# Altium PCB Charger-v1.1.PcbDoc (part 1 of 3)
Units mil, origin at the board's own origin, x right, y up, seen from the top; angles counter-clockwise.
Board outline 1633.11 x 2476.1 mil, 2 copper layers (Top Layer, Bottom Layer), stack 61.811 mil thick; 91 components, 62 nets, 311 pads, 190 vias.
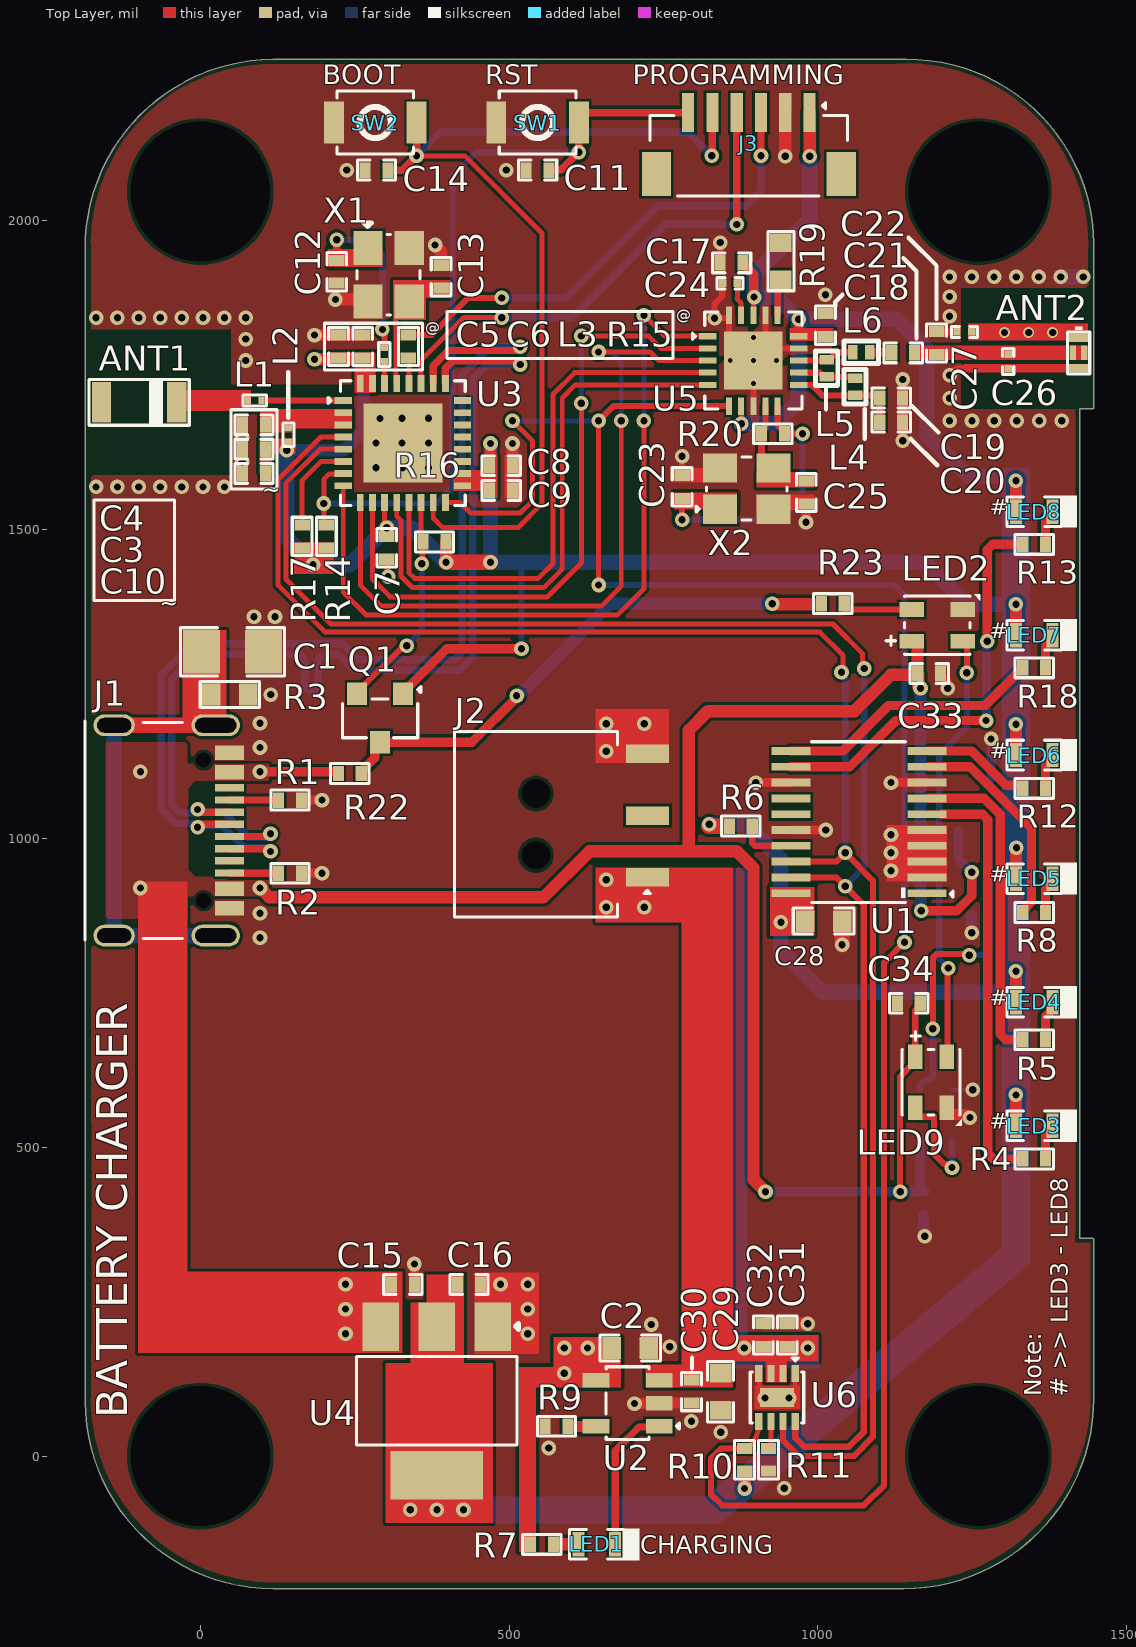
[diagram p0: Top Layer view]
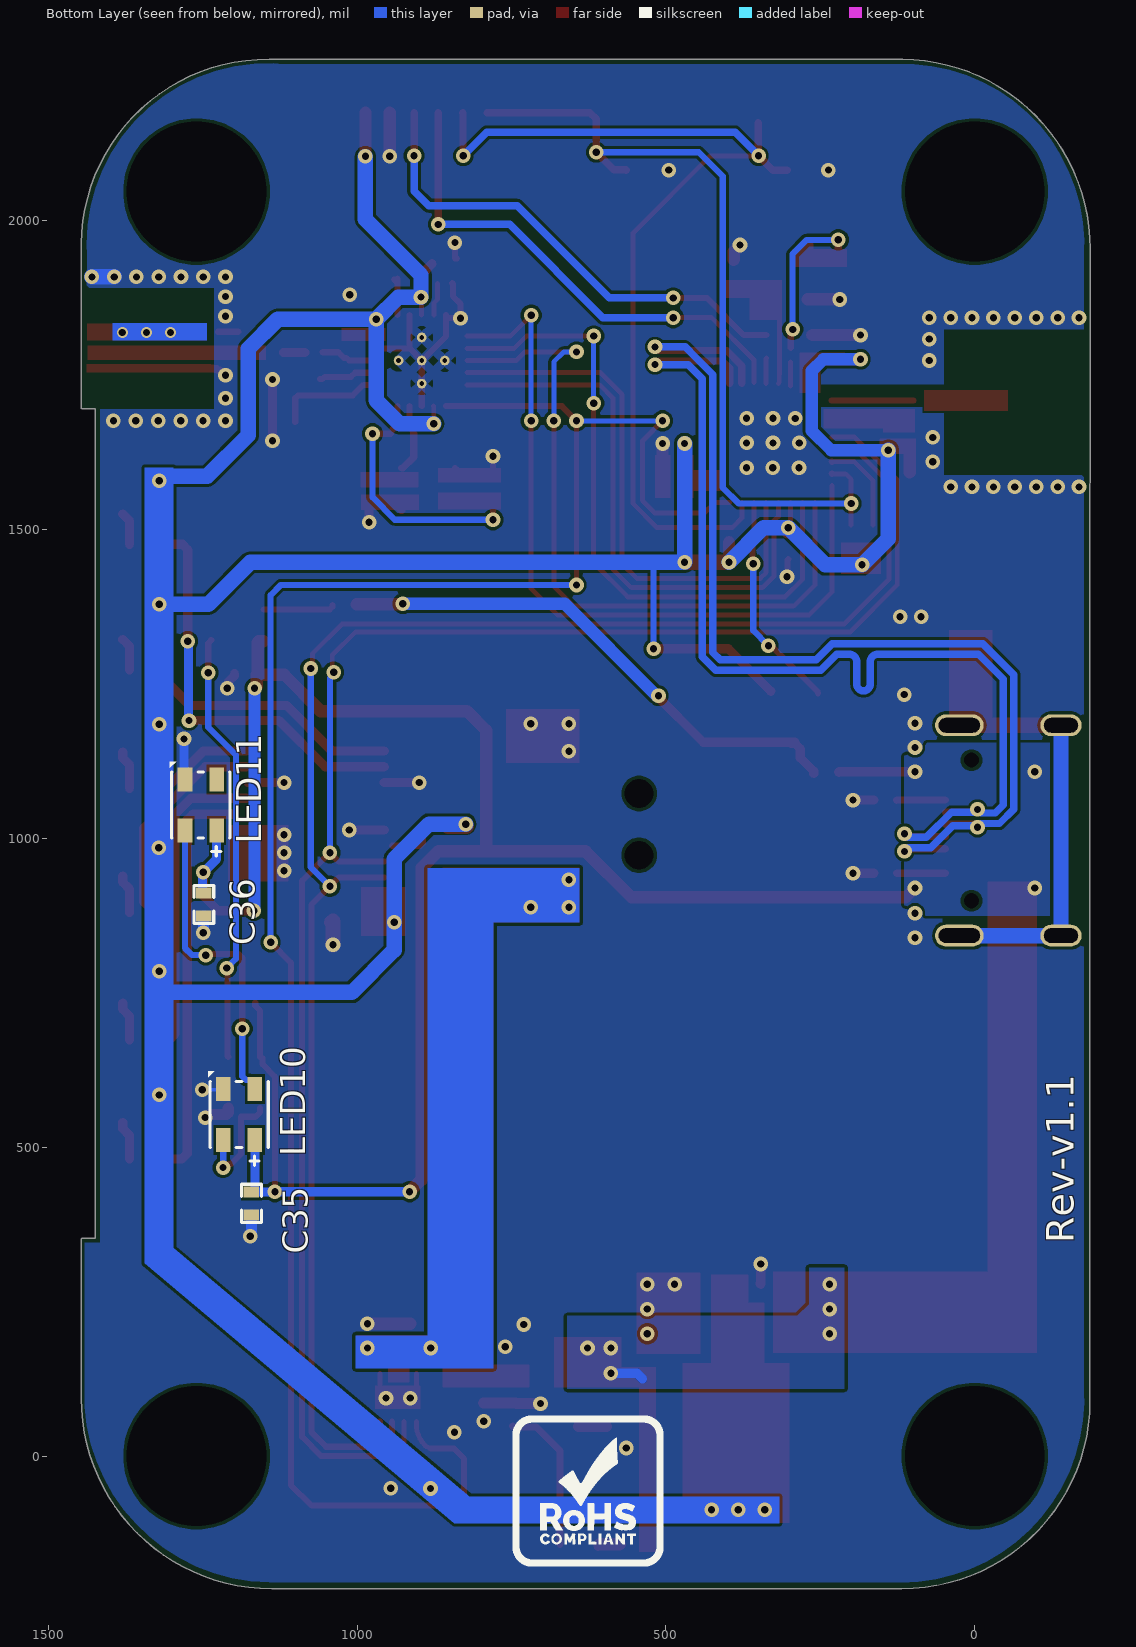
[diagram p1: Bottom Layer view, seen from below]
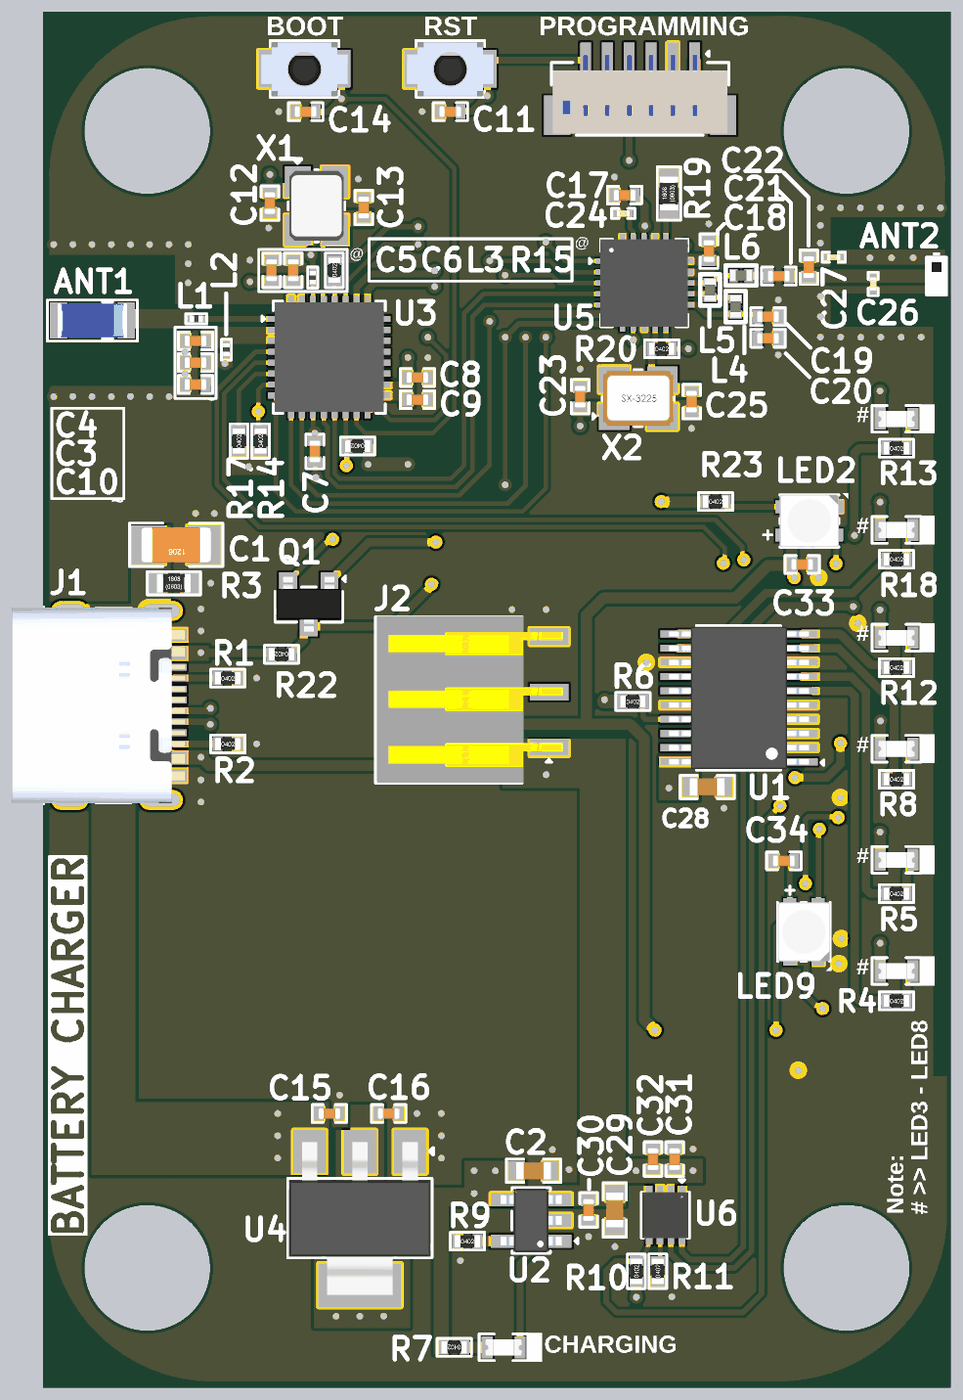
[diagram p3: 3D render of the assembled board from above, using the file's embedded part models]
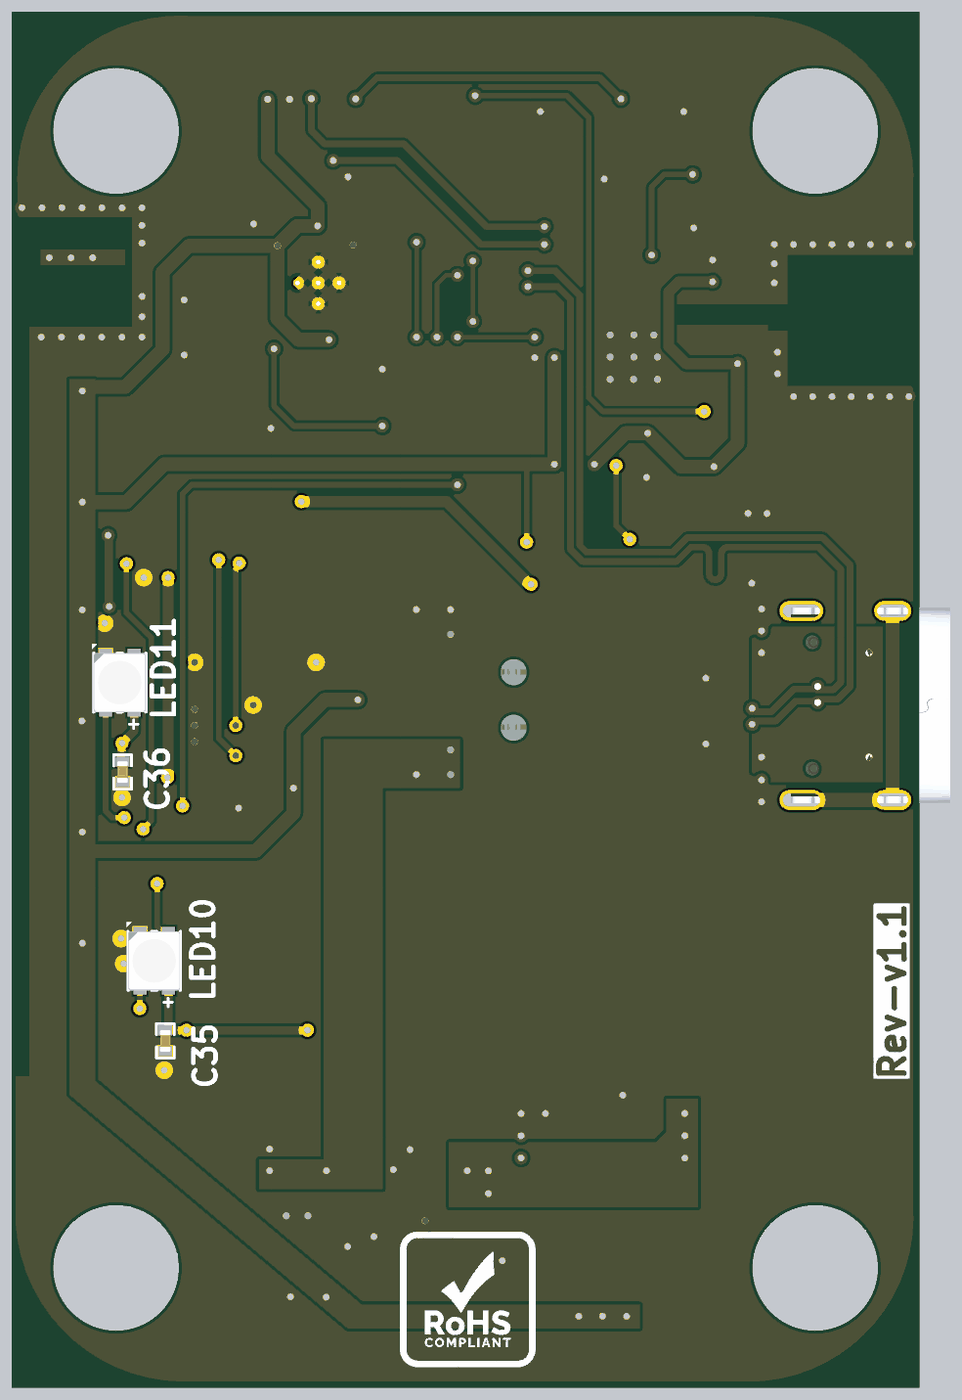
[diagram p4: 3D render of the assembled board from below, using the file's embedded part models]

## Layer stack, top to bottom
Top Solder: solder mask 0.394, Solder Resist, Dk 3.5
Top Layer: signal copper 1.378
Dielectric 1: dielectric 59.055, FR-4, Dk 4.8
Bottom Layer: signal copper 1.378
Bottom Solder: solder mask 0.394, Solder Resist, Dk 3.5

## Board outline
118.46,-214.76 cw(c117.52,89.29) -186.54,88.27 -186.54,1195.16 -186.61,1954.25 cw(c119.46,1955.27) 117.44,2261.34 1142.48,2261.3 cw(c1144.93,1959.73) 1446.5,1962.28 1446.42,1696.42 1445.39,1695.39 1423.5,1695.39 1423.5,352.28 1445.47,352.28 1446.5,351.26 1446.5,93.27 cw(c1138.48,93.25) 1138.5,-214.76

## Design rules (kind name [scope] priority, off if disabled: settings)
Clearance [All] p1: gap=5 ignorepadtopadclearanceinfootprint=FALSE except(4: Arc-SMDPad Track-SMDPad SMDPad-SMDPad SMDPad-THPad SMDPad-Fill SMDPad-Poly SMDPad-Region SMDPad-Hole)
DiffPairsRouting [All] p1: maxlimit=5 minlimit=5 mostfreqgap=5 toplayer_minwidth=12 toplayer_maxwidth=12 toplayer_prefwidth=12 bottomlayer_minwidth=12 bottomlayer_maxwidth=12 bottomlayer_prefwidth=12 impedanceprofiledriven=TRUE impedanceprofileid={F3DFE2B7-14DD-4F3A-BEFA-C17EAD8B0799} impedanceprofilevalue=90.000000 maxuncoupledlength=500
HoleSize [All] p1: absolutevalues=TRUE maxlimit=280 minlimit=1 maxpercent=80.000 minpercent=20.000
MatchedLengths "Schematic Matched Net Lengths" [InNetClass('USB_PROGRAM')] p1: tolerance=50 checknetsindiffpair=TRUE checkdiffpairvsdiffpair=FALSE checkxsignals=FALSE checkothers=FALSE
MaxMinImpedance "Schematic Impedance Constraint" [InNetClass('USB_PROGRAM')] p1: minimum=85.00 maximum=90.00
MinimumSolderMaskSliver [All] p1: minsoldermaskwidth=0
PolygonConnect [All] p1: thpad.connectstyle=Relief thpad.reliefconductorwidth=15 thpad.reliefentries=4 thpad.polygonreliefangle="45 Angle" thpad.airgapwidth=10 smdpad.connectstyle=Direct smdpad.reliefconductorwidth=10 smdpad.reliefentries=4 smdpad.polygonreliefangle="90 Angle" smdpad.airgapwidth=10 via.connectstyle=Direct via.reliefconductorwidth=10 via.reliefentries=4 via.polygonreliefangle="90 Angle" via.airgapwidth=10
RoutingVias [All] p1: holewidth=11.81 width=23.62 viastyle="Through Hole" minholewidth=11.81 minwidth=17.72 maxholewidth=11.81 maxwidth=23.62
SilkToSilkClearance [All] p1: silktosilkclearance=0
SilkToSolderMaskClearance [IsPad] p1: minsilkscreentomaskgap=0 clearancetoexposedcopper=TRUE
SolderMaskExpansion [All] p1: expansion=4 istentingtop=FALSE
UnRoutedNet [All] p1: checkbadconnections=TRUE
Width Width_RF2 [InNet('NetANT2_1')] p1: maxlimit=103.77 minlimit=103.77 preferedwidth=103.77 impedanceprofiledriven=TRUE impedanceprofileid={56603484-CAB0-46EE-9FE4-9C1C9247AB20} impedanceprofilevalue=50.000000 minimp=50.000000 maximp=50.000000 favimp=50.000000
Width [All] p2: maxlimit=100 minlimit=5 preferedwidth=10 minimp=50.000000 maximp=50.000000 favimp=50.000000
Width Width_RF1 [InNet('NetANT1_1')] p3: maxlimit=103.77 minlimit=103.77 preferedwidth=103.77 impedanceprofiledriven=TRUE impedanceprofileid={56603484-CAB0-46EE-9FE4-9C1C9247AB20} impedanceprofilevalue=50.000000 minimp=50.000000 maximp=50.000000 favimp=50.000000
24 further rules are at their usual default settings.

## Classes and differential pairs
differential pair class USB_PROGRAM_LINES: USB_D
net class USB_PROGRAM: USB_D_N USB_D_P
differential pair USB_D: +USB_D_P -USB_D_N

## Components (designator, comment, footprint, x,y, rotation, side; value= is the part's Value field where it differs from the comment)
ANT1 "2.4GHZ" RFANT3216120A5T -99,1705.85 r180 top locked
ANT2 "ANT016008LCS2442MA1" ANT016008LCS2442MA1 1422,1786 r270 top locked
C1 "4.7nF" Cap-1206 52,1302 r180 top locked
C2 "10uF" Cap-0603 696,175 r180 top locked
C3 "100nF" Cap-0402 86.93,1630.17 r0 top locked
C4 "100nF" Cap-0402 86.93,1669.43 r0 top locked
C5 "10nF" Cap-0402 223.93,1796.4 r270 top locked
C6 "1uF" Cap-0402 262.93,1796.4 r90 top locked
C7 "1uF" Cap-0402 301.93,1470.4 r270 top locked
C8 "100nF" Cap-0402 486.93,1603.4 r180 top locked
C9 "100nF" Cap-0402 486.93,1563.4 r180 top locked
C10 "10uF" Cap-0402 86.93,1590.91 r0 top locked
C11 "100nF" Cap-0402 546,2082 r180 top locked
C12 "22PF" Cap-0402 220.93,1917.4 r90 top locked value=22pF
C13 "22PF" Cap-0402 389.93,1909.4 r270 top locked value=22pF
C14 "100nF" Cap-0402 285.31,2082 r180 top locked
C15 "10nF" Cap-0402 328,278 r180 top locked
C16 "10nF" Cap-0402 435,278 r180 top locked
C17 "10nF" Cap-0402 860.07,1931.72 r0 top locked
C18 "1nF" Cap-0402 1012,1831 r270 top locked
C19 "4.7pF" Cap-0402 1118.5,1713 r180 top locked
C20 "2.2nF" Cap-0402 1118.5,1674 r180 top locked
C21 "1.5pF" Cap-0402 1138,1786 r0 top locked
C22 "1pF" Cap-0402 1192,1802 r90 top locked
C23 "22PF" Cap-0402 780,1569 r90 top locked value=22pF
C24 "33nF" CAP-0201 857.64,1898.72 r0 top locked
C25 "22PF" Cap-0402 981,1560.03 r270 top locked value=22pF
C26 "0.8pF" CAP-0201 1308,1772 r90 top locked
C27 "6.2pF" CAP-0201 1237,1820 r0 top locked
C28 "10uF" Cap-0603 1009,866 r180 top
C29 "10uF" Cap-0603 842.43,104.41 r90 top locked
C30 "1nF" Cap-0402 795.26,104.41 r90 top
C31 "1uF" Cap-0402 950.3,196.01 r270 top
C32 "100nF" Cap-0402 911.3,196.01 r90 top
C33 "100nF" Cap-0402 1180,1266.75 r180 top
C34 "100nF" Cap-0402 1147,733 r0 top
C35 "100nF" Cap-0402 1171,409 r90 bottom
C36 "100nF" Cap-0402 1248,893 r90 bottom
J1 "TYPE-C-31-M-12" TYPE-C-31-M-12_ -46.11,1012.86 r270 top locked
J2 "SIB-103-02-F-S-LC" SIB-103-02-F-S-LC 633.69,1036.86 r270 top locked
J3 "Voltlink Target" "Voltlink Target" 888.06,2125.3 r180 top locked
L1 "6.8nH" IND-0201 88.26,1708.94 r0 top locked
L2 "2nH" IND-0201 142.58,1653.35 r90 top locked
L3 "24nH" IND-0201 297.93,1783.4 r270 top locked
L4 "2.7nH" IND-0402 1060,1731 r270 top locked
L5 "8.2nH" IND-0402 1014,1761 r270 top locked
L6 "3.9nH" IND-0402 1070,1787 r0 top locked
LED1 "RED" LED-0603 642,-143 r0 top
LED2 "WS2812C-2427" WS2812C-2427 1193,1345 r0 top
LED3 "Emerald" LED-0603 1350,534.68 r0 top locked
LED4 "Emerald" LED-0603 1350,734.76 r0 top locked
LED5 "Emerald" LED-0603 1350,934.84 r0 top locked
LED6 "Emerald" LED-0603 1350,1134.92 r0 top locked
LED7 "Emerald" LED-0603 1350,1329 r0 top locked
LED8 "Emerald" LED-0603 1350,1529 r0 top locked
LED9 "WS2812C-2427" WS2812C-2427 1183,605 r270 top
LED10 "WS2812C-2427" WS2812C-2427 1191,553 r90 bottom
LED11 "WS2812C-2427" WS2812C-2427 1253,1054 r90 bottom
Q1 "Si2302CDS" Sot-23 291,1194.99 r180 top
R1 "5.1K" Res-0402 145.19,1062 r0 top locked
R2 "5.1K" Res-0402 145.19,943.55 r0 top locked
R3 "1M" Res-0603 47.86,1232.86 r180 top locked
R4 "470R" Res-0402 1350,481 r0 top locked
R5 "470R" Res-0402 1350,674 r0 top locked
R6 "10K" Res-0402 875,1020 r0 top
R7 "680R" Res-0402 553,-143 r180 top
R8 "470R" Res-0402 1350,880 r0 top locked
R9 "20K" Res-0402 576.75,48.14 r0 top locked
R10 "10K" Res-0402 881.15,-6.14 r90 top
R11 "10K" Res-0402 919.83,-6.01 r90 top
R12 "470R" Res-0402 1350,1081 r0 top locked
R13 "470R" Res-0402 1350,1476 r0 top locked
R14 "10K" Res-0402 204,1488.9 r90 top
R15 "499R" Res-0402 336.93,1796.4 r90 top locked
R16 "10K" Res-0402 379.09,1479.9 r180 top locked
R17 "10K" Res-0402 164.9,1488.9 r90 top
R18 "470R" Res-0402 1350,1276 r0 top locked
R19 "22K" Res-0603 939.98,1934.63 r270 top locked value=22kR
R20 "1M" Res-0402 927,1655 r0 top locked
R22 "10K" Res-0402 242,1105 r180 top
R23 "1K" Res-0402 1024,1380 r0 top
SW1 "B3U-1000P" B3U-1000P 546,2159 r0 top locked
SW2 "B3U-1000P" B3U-1000P 283.31,2159 r0 top locked
U1 "TLC59108FIPWR" TSSOP-20 1066.24,1026.39 r180 top locked
U2 "TP4054" SOT-23-5 691.63,85.54 r180 top locked
U3 "ESP32-C3FH4" "32-QFN (5x5)" 327.88,1639.94 r0 top locked
U4 "LDL1117S33R" "SOT- 223" 383,89 r180 top locked
U5 "NRF24L01" "20-QFN (4x4) EP Via" 895.38,1773.63 r0 top locked
U6 "MAX17048G+T10" "8-TDFN-EP (2x2)" 933.67,94.83 r270 top
X1 "40MHz" X322540MPB4SI_ 304.93,1912.4 r270 top locked value=40MHZ
X2 "16MHz" SMD3225-4P 884.78,1566.19 r0 top locked

## Footprints (in the part's own frame and the unit in brackets; to place one, negate y for a bottom-side part, rotate by r counter-clockwise, add the part's x,y. Pads: shape width x height; smd on the part's side, far side on the other; paste and mask are expansions set on the pad)
"8-TDFN-EP (2x2)" [mm]
  rect 0.7x0.3 smd: 1(-0.99,0.75) 2(-0.99,0.25) 3(-0.99,-0.25) 4(-0.99,-0.75) 5(0.99,-0.75) 6(0.99,-0.25) 7(0.99,0.25) 8(0.99,0.75)
  rect 0.8x1.38 smd: 9(0,0)
  silkscreen extent -1.63,-1.1 1.05,1.1, body extent -1.05,-1.05 1.05,1.05, height 0.81
"20-QFN (4x4) EP Via" [mm]
  rect 0.72x0.25 smd mask+0.07: 1(-1.87,1) 2(-1.87,0.5) 3(-1.87,0) 4(-1.87,-0.5) 5(-1.87,-1) 11(1.87,-1) 12(1.87,-0.5) 13(1.87,0) 14(1.87,0.5) 15(1.87,1)
  rect 0.25x0.72 smd mask+0.07: 6(-1,-1.87) 7(-0.5,-1.87) 8(0,-1.87) 9(0.5,-1.87) 10(1,-1.87) 16(1,1.87) 17(0.5,1.87) 18(0,1.87) 19(-0.5,1.87) 20(-1,1.87)
  round 0 / inner round 0.4 / far side round 0.4 hole 0.2: 21(-0.95,0) 21(0,-0.95) 21(0,0) 21(0,0.95) 21(0.95,0)
  rect 2.4x2.4 smd paste-2: 21(0,0)
  silkscreen extent -2.5,-2 2,2, body extent -2,-2 2,2, height 0.95
"32-QFN (5x5)" [mm] "32pins, 5x5mm body, 0.5mm pitch QFN package"
  rect 0.7x0.28 smd: 1(-2.45,1.75) 2(-2.45,1.25) 3(-2.45,0.75) 4(-2.45,0.25) 5(-2.45,-0.25) 6(-2.45,-0.75) 7(-2.45,-1.25) 8(-2.45,-1.75) 17(2.45,-1.75) 18(2.45,-1.25) 19(2.45,-0.75) 20(2.45,-0.25) 21(2.45,0.25) 22(2.45,0.75) 23(2.45,1.25) 24(2.45,1.75)
  rect 0.28x0.7 smd: 9(-1.75,-2.45) 10(-1.25,-2.45) 11(-0.75,-2.45) 12(-0.25,-2.45) 13(0.25,-2.45) 14(0.75,-2.45) 15(1.25,-2.45) 16(1.75,-2.45) 25(1.75,2.45) 26(1.25,2.45) 27(0.75,2.45) 28(0.25,2.45) 29(-0.25,2.45) 30(-0.75,2.45) 31(-1.25,2.45) 32(-1.75,2.45)
  rect 3.254x3.254 smd: 33(0,0)
  silkscreen extent -3.07,-2.57 2.57,2.57, body extent -2.5,-2.5 2.5,2.5, height 0.85
ANT016008LCS2442MA1 [mm]
  rect 0.35x0.8 smd paste-1 mask+0: 1(-0.625,0) 4(0.625,0)
  rect 0.6x0.26 smd paste-1 mask+0: 2(0,0.235) 3(0,-0.235)
  silkscreen extent -1.09,-0.46 0.86,0.46, body extent -0.8,-0.4 0.8,0.4, height 0.4
B3U-1000P [mm] "SWITCH TACTILE SPST-NO 0.05A 12V"
  rect 0.82x1.72 smd: 1(-1.7,0) 2(1.7,0)
  silkscreen extent -1.57,-1.3 1.57,1.3, body extent -2,-1.26 2,1.24, height 1.6
CAP-0201 [mm]
  rect 0.3x0.3 smd mask+0.055: 1(-0.3,0) 2(0.3,0)
  silkscreen extent -0.53,-0.23 0.53,0.23, body extent -0.3,-0.15 0.3,0.15, height 0.28
Cap-0402 [mil]
  rect 18x25 smd mask+2.36: 1(-18.5,0) 2(18.5,0)
  silkscreen extent -31,-16 31,16, body extent -20,-10 20,10, height 19
Cap-0603 [mil]
  rect 30x35 smd mask+2.36: 1(-30,0) 2(30,0)
  silkscreen extent -49,-21 49,21, body extent -32,-16 31,16, height 34
Cap-1206 [mil] "SMD 1206"
  rect 60x70 smd: 1(-50,0) 2(50,0)
  silkscreen extent -84,-39 84,39, body extent -63,-31 63,32, height 39
IND-0201 [mm]
  rect 0.25x0.3 smd mask+0.055: 1(-0.275,0) 2(0.275,0)
  silkscreen extent -0.48,-0.23 0.48,0.23, body extent -0.3,-0.15 0.3,0.15, height 0.15
IND-0402 [mm]
  rect 0.4x0.6 smd: 1(-0.35,0) 2(0.35,0)
  silkscreen extent -0.71,-0.46 0.71,0.46, body extent -0.5,-0.25 0.5,0.25, height 0.25
LED-0603 [mm]
  rect 0.5x1 smd: 1(-0.75,0) 2(0.75,0)
  silkscreen extent -1.12,-0.66 1.75,0.66, body extent -0.82,-0.37 0.82,0.36, height 0.68
Res-0402 [mil]
  rect 18x25 smd mask+2.17: 1(-18.5,0) 2(18.5,0)
  silkscreen extent -32,-17 32,16, body extent -23,-11 23,11, height 16
Res-0603 [mil]
  rect 30x35 smd: 1(-30,0) 2(30,0)
  silkscreen extent -48,-21 48,21, body extent -31,-17 31,17, height 18
RFANT3216120A5T [mm]
  rect 0.8x1.66 smd paste+0 mask+0.051: 1(-1.55,0) 2(1.55,0)
  silkscreen extent -2.06,-0.99 2.06,0.97, body extent -1.6,-0.8 1.6,0.8, height 1.2
SIB-103-02-F-S-LC [mm]
  rect 0.762x1.778 smd: 1(2.54,2.295) 2(0,2.295) 3(-2.54,2.295)
  round 0 hole 1.19 unplated: ""(-0.91,-2.295) ""(1.63,-2.295)
  silkscreen extent -3.45,-5.65 4.17,2.41, body extent -3.48,-5.59 4.14,2.92, height 5.25
SMD3225-4P [mm]
  rect 1.4x1.2 smd: 1(-1.1,-0.85) 2(1.1,-0.85) 3(1.1,0.85) 4(-1.1,0.85)
  silkscreen extent -2.08,-1.3 1.65,1.3, body extent -1.6,-1.25 1.6,1.25, height 0.81
Sot-23 [mm] "TRANS NPN 40V 0.6A SOT23"
  rect 0.82x0.92 smd: 1(-0.95,-1) 2(0.95,-1) 3(0,1)
  silkscreen extent -1.68,-1.3 1.55,0.81, body extent -1.5,-1.25 1.5,1.25, height 1.05
SOT-23-5 [mm]
  rect 1.1x0.6 smd: 1(-1.3,0.95) 2(-1.3,0) 3(-1.3,-0.95) 4(1.3,-0.95) 5(1.3,0.95)
  silkscreen extent -2.13,-1.5 0.88,1.5, body extent -1.4,-1.45 1.4,1.45, height 1.45
"SOT- 223" [mm]
  rect 1.5x2 smd: 1(-2.3,-3.05) 2(0,-3.05) 3(2.3,-3.05)
  rect 3.8x2 smd: 4(0,3.05)
  silkscreen extent -3.35,-3.2 3.3,1.8, body extent -3.25,-3.5 3.25,3.5, height 1.61
TSSOP-20 [mm]
  rect 1.6x0.32 smd: 1(-2.8,2.925) 2(-2.8,2.275) 3(-2.8,1.625) 4(-2.8,0.975) 5(-2.8,0.325) 6(-2.8,-0.325) 7(-2.8,-0.975) 8(-2.8,-1.625) 9(-2.8,-2.275) 10(-2.8,-2.925) 11(2.8,-2.925) 12(2.8,-2.275) 13(2.8,-1.625) 14(2.8,-0.975) 15(2.8,-0.325) 16(2.8,0.325) 17(2.8,0.975) 18(2.8,1.625) 19(2.8,2.275) 20(2.8,2.925)
  silkscreen extent -3.88,-3.3 1.95,3.3, body extent -3.2,-3.25 3.2,3.25, height 1.2
TYPE-C-31-M-12_ [mm]
  rect 0.6x1.2 smd: A1/B12(-3.2,2.375) A4/B9(-2.4,2.375) B1/A12(3.2,2.375) B4/A9(2.4,2.375)
  rect 0.3x1.2 smd: A5(-1.25,2.375) A6(-0.25,2.375) A7(0.25,2.375) A8(1.25,2.375) B5(1.75,2.375) B6(0.75,2.375) B7(-0.75,2.375) B8(-1.75,2.375)
  round 0 hole 0.62 unplated: MH(-2.89,1.305) MH(2.89,1.305)
  oval 0.9x2 hole 0.6 slot 1.7 at 90 deg: S1(4.325,1.805) S4(-4.325,1.805)
  oval 0.9x1.7 hole 0.6 slot 1.4 at 90 deg: S2(4.325,-2.375) S3(-4.325,-2.375)
  silkscreen extent -4.5,-3.57 4.5,0.44, body extent -4.47,-5.01 4.47,2.89, height 3.31
"Voltlink Target" [mm]
  rect 0.5x1.6 smd: 1(-2.5,-1.262) 2(-1.5,-1.262) 3(-0.5,-1.262) 4(0.5,-1.262) 5(1.5,-1.262) 6(2.5,-1.262)
  rect 1.2x1.8 smd: MP1(-3.8,1.262) MP2(3.8,1.262)
  silkscreen extent -4.06,-1.68 4.06,2.17, body extent -4,-1.49 4,2.11, height 4.25
WS2812C-2427 [mm]
  rect 1x0.6 smd paste+0 mask+0.051: 1(-1.05,0.65) 2(-1.05,-0.65) 3(1.05,-0.65) 4(1.05,0.65)
  silkscreen extent -2.1,-1.2 1.78,1.27, body extent -1.35,-1.2 1.35,1.2, height 1.12
X322540MPB4SI_ [mm]
  rect 1.4x1.2 smd: 1(-1.1,-0.85) 2(1.1,-0.85) 3(1.1,0.85) 4(-1.1,0.85)
  silkscreen extent -2.13,-1.3 1.65,1.3, body extent -1.6,-1.25 1.6,1.25, height 0.8

## Part data
ANT1: library part RFANT3216120A5T, "2.4GHZ CERAMIC CHIP ANTENNA", Case/Package=CSMD, Frequency=2.4GHz, LCSC Part Number=C127629, Manufacturer="Walsin Technologies", Package Quantity=2000, Supplier Part Number=1292-1000-1-ND, Bandwidth=150MHz, Category="RF Antennas", ComponentLink1Description=https://datasheet.ciiva.com/26865/getdatasheetpartid-490374-26865067.pdf?src-supplier=Verical, ComponentLink1URL=https://datasheet.ciiva.com/26865/getdatasheetpartid-490374-26865067.pdf?src-supplier=Verical, ComponentLink2Description=https://datasheet.ciiva.com/26233/1-2rfant3216120a5t-26233244.pdf?src-supplier=Digikey, ComponentLink2URL=https://datasheet.ciiva.com/26233/1-2rfant3216120a5t-26233244.pdf?src-supplier=Digikey, ComponentLink3Description=https://datasheet.ciiva.com/26233/1-2rfant3216120a5t-26233238.pdf?src-supplier=Digikey, ComponentLink3URL=https://datasheet.ciiva.com/26233/1-2rfant3216120a5t-26233238.pdf?src-supplier=Digikey, Impedance=50R, Item Type=Antenna, Manufacturer Part Number=RFANT3216120A5T, Mounting Technology="Surface Mount", Number of Bands=1, Packaging="Tape and Reel", Pins=2, Pricing="1=0.5, 10=0.403, 25=0.3692, 100=0.2747, 250=0.24896, 500=0.20604, 1000=0.15453 (USD)", Radiation Hardening=No, RoHS=Yes, Series=-, Stock=28669, Supplier=Digikey, Termination=Solder, VSWR=2
ANT2: "RF ANT 2.4GHZ CHIP SOLDER SMD", Clock Frequency=2.442GHz, Manufacturer=TDK, Category="RF Antennas", ComponentLink1Description=https://datasheet.ciiva.com/30000/rf-ant-ant016008lcs2442ma1-en-30000418.pdf?src-supplier=Avnet, ComponentLink1URL=https://datasheet.ciiva.com/30000/rf-ant-ant016008lcs2442ma1-en-30000418.pdf?src-supplier=Avnet, Height=0.016inch, Item Type=Antenna, Manufacturer Part Number=ANT016008LCS2442MA1, Mounting Technology="Surface Mount", Number of Bands=1, Packaging="Cut Tape", Pricing="1=0.2741, 10=0.2669, 25=0.2642, 100=0.2529, 250=0.2504, 500=0.2494, 1000=0.2485, 3000=0.2475, 6000=0.2466 (USD)", Reach SVHC Compliant=No, RoHS=Yes, RoHS Compliant=Yes, Series=-, Stock=9369, Supplier="Arrow Electronics", Supplier Part Number=ANT016008LCS2442MA1, Termination=Solder, VSWR=3
C1: library part CC1206KKX7RCBB472, "CAP CER 4700PF 1KV X7R 1206", Case Code (Imperial)=1206, Case Code (Metric)=3216, Dielectric=X7R, Dielectric Material=Ceramic, LCSC Part Number=C107198, Manufacturer=Yageo, Max Operating Temperature=125°C, Min Operating Temperature=-55°C, Supplier Part Number 1=7130131, Tolerance=10%, Voltage Rating=1kV, Capacitance=4.7nF, Case/Package=1206, Category="Ceramic Capacitors", ComponentLink1Description=https://datasheet.ciiva.com/13208/upy-gp-np0-16v-to-50v-8-13208693.pdf?src-supplier=Mouser, ComponentLink1URL=https://datasheet.ciiva.com/13208/upy-gp-np0-16v-to-50v-8-13208693.pdf?src-supplier=Mouser, ComponentLink2Description=https://datasheet.ciiva.com/11466/hv-11466701.pdf?src-supplier=Avnet, ComponentLink2URL=https://datasheet.ciiva.com/11466/hv-11466701.pdf?src-supplier=Avnet, Depth=1.6mm, Item Type=Capacitor, Lead Free="Lead Free", Length=3.2mm, Manufacturer Part Number=CC1206KKX7RCBB472, Mount="Surface Mount", Number of Pins=2, Packaging="Tape and Reel", Pricing 1="3000=0.02860, 9000=0.02750, 15000=0.02700, 45000=0.02600, 75000=0.02510 (USD)", Radiation Hardening=No, Resistor Type=Ceramic, RoHS=Yes, RoHS Compliant=Yes, Series=CC, Stock 1=180000, Supplier 1="Future Electronics", Termination=SMD/SMT, Thickness=0.057inch, Voltage Rating (DC)=1kV, Weight=0.000571oz, Width=0.063inch
C2 C28 C29: library part CL10A106MA8NRNC, "CAP CER 10UF 25V X5R 0603", Case Code (Imperial)=0603, Case Code (Metric)=1608, Dielectric=X5R, LCSC Part Number=C96446, Manufacturer=Samsung, Max Operating Temperature=85°C, Min Operating Temperature=-55°C, Package Quantity=1, Tolerance=20%, Voltage Rating=25V, Capacitance=10uF, Case/Package=0603, Category="Ceramic Capacitors", ComponentLink1Description=https://datasheet.ciiva.com/25766/cl10a106ma8nrnc-25766562.pdf?src-supplier=Digi-Key, ComponentLink1URL=https://datasheet.ciiva.com/25766/cl10a106ma8nrnc-25766562.pdf?src-supplier=Digi-Key, Construction=Flat, Contact Plating=Tin, Lead Free="Lead Free", Length=0.063inch, Manufacturer Part Number=CL10A106MA8NRNC, Mount="Surface Mount", Packaging="Tape and Reel", Pricing 1="4000=0.03753, 8000=0.03700, 16000=0.03595, 24000=0.03515, 32000=0.03383, 40000=0.03304, 400000=0.03225 (USD)", RoHS=Yes, RoHS Compliant=Yes, Series=CL, Supplier 1=Avnet, Supplier Part Number 1=CL10A106MA8NRNC, Termination=Wraparound, Thickness=0.035inch, Width=0.031inch
C3 C4 C8 C9 C11 C14 C32 C33 C34 C35 C36: library part CC0402KRX5R7BB104, "CAP CER 0.1UF 16V X5R 0402", Case Code (Imperial)=0402, Case Code (Metric)=1005, Dielectric=X5R, LCSC Part Number=C106204, Manufacturer=Yageo, Max Operating Temperature=85°C, Min Operating Temperature=-55°C, Package Quantity=1, Resistor Type=Ceramic, Supplier Part Number 1=603-CC402KRX5R7BB104, Tolerance=10%, Voltage Rating=16V, Capacitance=100nF, Case/Package=0402, Category="Ceramic Capacitors", ComponentLink1Description=https://datasheet.ciiva.com/155/mlccorderingcode-155879.pdf?src-supplier=Digi-Key, ComponentLink1URL=https://datasheet.ciiva.com/155/mlccorderingcode-155879.pdf?src-supplier=Digi-Key, ComponentLink2Description=https://datasheet.ciiva.com/155/mlccorderingcode-155878.pdf?src-supplier=Digi-Key, ComponentLink2URL=https://datasheet.ciiva.com/155/mlccorderingcode-155878.pdf?src-supplier=Digi-Key, ComponentLink3Description=https://datasheet.ciiva.com/155/mlccorderingcode-155880.pdf?src-supplier=Digi-Key, ComponentLink3URL=https://datasheet.ciiva.com/155/mlccorderingcode-155880.pdf?src-supplier=Digi-Key, ComponentLink4Description=https://datasheet.ciiva.com/11464/upy-gphc-x5r-4v-to-50v-12-11464869.pdf?src-supplier=Avnet, ComponentLink4URL=https://datasheet.ciiva.com/11464/upy-gphc-x5r-4v-to-50v-12-11464869.pdf?src-supplier=Avnet, Construction=Flat, Depth=0.5mm, Halogen Free="Halogen Free", Height=0.5mm, Lead Free="Lead Free", Length=1mm, Manufacturer Part Number=CC0402KRX5R7BB104, Mount="Surface Mount", Number of Pins=2, Packaging="Tape and Reel", Pricing 1="1=0.10000, 10=0.02300, 50=0.02300, 100=0.01100, 1000=0.00600, 10000=0.00400 (USD)", Radiation Hardening=No, REACH SVHC=Unknown, RoHS=Yes, RoHS Compliant=Yes, Series=CC, Stock 1=936792, Supplier 1=Mouser, Termination=SMD/SMT, Thickness=0.022inch, Voltage Rating (DC)=16V, Width=0.02inch
C5 C15 C16: library part CC0402KRX7R8BB103, "CAP CER 10000PF 25V X7R 0402", Case Code (Imperial)=0402, Case Code (Metric)=1005, Dielectric=X7R, LCSC Part Number=C327025, Manufacturer=Yageo, Max Operating Temperature=125°C, Min Operating Temperature=-55°C, Package Quantity=1, Supplier Part Number 1=311-1337-1-ND, Tolerance=10%, Voltage Rating=25V, Capacitance=10nF, Case/Package=0402, ComponentLink1Description=http://www.yageo.com/documents/recent/UPY-GPHC_X7R_6.3V-to-50V_18.pdf?src-supplier=Digi-Key, ComponentLink1URL=http://www.yageo.com/documents/recent/UPY-GPHC_X7R_6.3V-to-50V_18.pdf?src-supplier=Digi-Key, ComponentLink2Description=https://www.verical.com/server-webapp/html/getDatasheet?partID=375418&src-supplier=Verical, ComponentLink2URL=https://www.verical.com/server-webapp/html/getDatasheet?partID=375418&src-supplier=Verical, ComponentLink3Description=http://www.yageo.com/documents/recent/UPY-GPHC_X7R_6.3V-to-50V_8.pdf?src-supplier=Avnet, ComponentLink3URL=http://www.yageo.com/documents/recent/UPY-GPHC_X7R_6.3V-to-50V_8.pdf?src-supplier=Avnet, ComponentLink4Description=https://4donline.ihs.com/images/VipMasterIC/IC/YAGO/YAGO-S-A0003557223/YAGO-S-A0003557223-1.pdf?hkey=52A5661711E402568146F3353EA87419&src-supplier=Element14, ComponentLink4URL=https://4donline.ihs.com/images/VipMasterIC/IC/YAGO/YAGO-S-A0003557223/YAGO-S-A0003557223-1.pdf?hkey=52A5661711E402568146F3353EA87419&src-supplier=Element14, ComponentLink5Description=http://www.farnell.com/datasheets/2167236.pdf?src-supplier=Element14, ComponentLink5URL=http://www.farnell.com/datasheets/2167236.pdf?src-supplier=Element14, ComponentLink6Description=http://www.mouser.com/ds/2/447/Yageo_UPY-GP_NP0_16V-to-50V_9-358835.pdf?src-supplier=Mouser, ComponentLink6URL=http://www.mouser.com/ds/2/447/Yageo_UPY-GP_NP0_16V-to-50V_9-358835.pdf?src-supplier=Mouser, Composition=Ceramic, Depth=0.5mm, Halogen Free="Halogen Free", Height=0.5mm, Item Type=Capacitor, Lead Free="Lead Free", Length=1mm, Manufacturer Part Number=CC0402KRX7R8BB103, Mount="Surface Mount", Packaging="Tape and Reel", Pricing 1="1=0.1, 10=0.021, 100=0.0093, 500=0.00666, 1000=0.00523, 2500=0.00476, 5000=0.00438 (USD)", Radiation Hardening=No, REACH SVHC=Unknown, Stock 1=0, Supplier 1=Digi-Key, Termination=SMD/SMT, Thickness=0.022inch, Voltage Rating (DC)=25V, Width=0.02inch
C6 C7 C31: library part CC0402KRX5R7BB105, "CAP CER 1UF 16V X5R 0402", Case Code (Imperial)=0402, Case Code (Metric)=1005, Dielectric=X5R, LCSC Part Number=C325464, Manufacturer=Yageo, Max Operating Temperature=85°C, Min Operating Temperature=-55°C, Supplier Part Number 1=311-1691-6-ND, Tolerance=10%, Voltage Rating=16V, Capacitance=1uF, Case/Package=0402, ComponentLink1Description=http://www.yageo.com/documents/recent/UPY-GPHC_X5R_4V-to-50V_12.pdf?src-supplier=Avnet+Europe, ComponentLink1URL=http://www.yageo.com/documents/recent/UPY-GPHC_X5R_4V-to-50V_12.pdf?src-supplier=Avnet+Europe, Composition=Ceramic, Depth=0.5mm, Halogen Free="Halogen Free", Height=0.5mm, Item Type=Capacitor, Lead Free="Lead Free", Length=1mm, Manufacturer Part Number=CC0402KRX5R7BB105, Mount="Surface Mount", Packaging="Tape and Reel", Pricing 1="1=0.36, 10=0.252, 100=0.1512, 500=0.1134, 1000=0.09576, 2500=0.09072, 5000=0.08568 (USD)", Radiation Hardening=No, Stock 1=1405667, Supplier 1=Digi-Key, Termination=SMD/SMT, Thickness=0.022inch, Voltage Rating (DC)=16V, Weight=2.3E-05oz, Width=0.02inch
C10: library part CC0402MRX5R6BB106, "CAP CER 10UF 10V X5R 0402", Case Code (Imperial)=0402, Case Code (Metric)=1005, LCSC Part Number=C962143, Manufacturer=Yageo, Max Operating Temperature=85°C, Min Operating Temperature=-55°C, Supplier Part Number 1=6097631, Tolerance=20%, Voltage Rating=10V, Capacitance=10uF, Case/Package=0402, Category="Ceramic Capacitors", ComponentLink1Description=http://www.yageo.com/documents/recent/UPY-GPHC_X5R_4V-to-50V_25.pdf?src-supplier=Digi-Key, ComponentLink1URL=http://www.yageo.com/documents/recent/UPY-GPHC_X5R_4V-to-50V_25.pdf?src-supplier=Digi-Key, Item Type=Capacitor, Manufacturer Part Number=CC0402MRX5R6BB106, Mount="Surface Mount", Packaging="Tape and Reel", Pricing 1="10000=0.02650, 20000=0.02590, 30000=0.02550, 40000=0.02530, 50000=0.02450 (USD)", RoHS=Yes, RoHS Compliant=Yes, Stock 1=80000, Supplier 1="Future Electronics"
C12 C13 C23 C25: library part CC0402JRNPO9BN220, "CAP CER 22PF 50V C0G/NPO 0402", Case Code (Imperial)=0402, Case Code (Metric)=1005, Dielectric=C0G, Dielectric Material=Ceramic, Insulation Resistance=100GR, LCSC Part Number=C106203, Manufacturer=Yageo, Max Operating Temperature=125°C, Min Operating Temperature=-55°C, Package Quantity=1, Supplier Part Number 1=9105957, Temperature Coefficient=30ppm/°C, Tolerance=5%, Voltage=50V, Case/Package=0402, Category="Ceramic Capacitors", ComponentLink1Description=https://datasheet.ciiva.com/5789/1443161-5789509.pdf?src-supplier=Farnell, ComponentLink1URL=https://datasheet.ciiva.com/5789/1443161-5789509.pdf?src-supplier=Farnell, ComponentLink2Description=https://datasheet.ciiva.com/8033/1443161-8033606.pdf?src-supplier=Element14, ComponentLink2URL=https://datasheet.ciiva.com/8033/1443161-8033606.pdf?src-supplier=Element14, ComponentLink3Description=https://datasheet.ciiva.com/7656/1132289-7656615.pdf?src-supplier=Element14, ComponentLink3URL=https://datasheet.ciiva.com/7656/1132289-7656615.pdf?src-supplier=Element14, ComponentLink4Description=https://datasheet.ciiva.com/8033/1443161-8033607.pdf?src-supplier=Element14, ComponentLink4URL=https://datasheet.ciiva.com/8033/1443161-8033607.pdf?src-supplier=Element14, ComponentLink5Description=https://datasheet.ciiva.com/8033/1443161-8033605.pdf?src-supplier=Element14, ComponentLink5URL=https://datasheet.ciiva.com/8033/1443161-8033605.pdf?src-supplier=Element14, ComponentLink6Description=https://datasheet.ciiva.com/143/mlccorderingcode-143987.pdf?src-supplier=Digi-Key, ComponentLink6URL=https://datasheet.ciiva.com/143/mlccorderingcode-143987.pdf?src-supplier=Digi-Key, ComponentLink7Description=https://datasheet.ciiva.com/143/mlccorderingcode-143986.pdf?src-supplier=Digi-Key, ComponentLink7URL=https://datasheet.ciiva.com/143/mlccorderingcode-143986.pdf?src-supplier=Digi-Key, ComponentLink8Description=https://datasheet.ciiva.com/143/mlccorderingcode-143988.pdf?src-supplier=Digi-Key, ComponentLink8URL=https://datasheet.ciiva.com/143/mlccorderingcode-143988.pdf?src-supplier=Digi-Key, ComponentLink9Description=https://datasheet.ciiva.com/5425/upy-gp-np0-16v-to-50v-8-5425483.pdf?src-supplier=Mouser, ComponentLink9URL=https://datasheet.ciiva.com/5425/upy-gp-np0-16v-to-50v-8-5425483.pdf?src-supplier=Mouser, ComponentLink10Description=https://datasheet.ciiva.com/15189/getdatasheetpartid-370074-15189117.pdf?src-supplier=Verical, ComponentLink10URL=https://datasheet.ciiva.com/15189/getdatasheetpartid-370074-15189117.pdf?src-supplier=Verical, Depth=0.5mm, Height=0.5mm, Item Type=Capacitor, Lead Free="Lead Free", Length=1mm, Manufacturer Part Number=CC0402JRNPO9BN220, Mounting Technology="Surface Mount", Packaging="Tape and Reel", Pins=2, Pricing 1="10000=0.00220, 40000=0.00210, 150000=0.00200, 400000=0.00190, 1000000=0.00180 (USD)", Radiation Hardening=No, Reach SVHC Compliant=Yes, Resistor Type=Ceramic, RoHS=Yes, RoHS Compliant=Yes, Series=CC, Stock 1=200000, Supplier 1="Future Electronics", Termination=SMD/SMT, Thickness=0.022inch, Voltage Rating=50V, Voltage Rating (DC)=50V, Width=0.02inch
C17: library part CC0402KRX7R9BB103, "CAP CER 10000PF 50V X7R 0402", Case Code (Imperial)=0402, Case Code (Metric)=1005, Dielectric=X7R, LCSC Part Number=C60133, Manufacturer=Yageo, Max Operating Temperature=125°C, Min Operating Temperature=-55°C, Package Quantity=1, Resistor Type=Ceramic, Tolerance=10%, Voltage=50V, Capacitance=10nF, Case/Package=0402, Category="Ceramic Capacitors", ComponentLink1Description=https://datasheet.ciiva.com/11788/0900766b8079c870-11788375.pdf?src-supplier=RSComponents, ComponentLink1URL=https://datasheet.ciiva.com/11788/0900766b8079c870-11788375.pdf?src-supplier=RSComponents, ComponentLink2Description=https://datasheet.ciiva.com/26862/getdatasheetpartid-138248-26862642.pdf?src-supplier=Verical, ComponentLink2URL=https://datasheet.ciiva.com/26862/getdatasheetpartid-138248-26862642.pdf?src-supplier=Verical, ComponentLink3Description=https://datasheet.ciiva.com/7978/1489800-7978093.pdf?src-supplier=Element14, ComponentLink3URL=https://datasheet.ciiva.com/7978/1489800-7978093.pdf?src-supplier=Element14, ComponentLink4Description=https://datasheet.ciiva.com/28450/1489800-28450377.pdf?src-supplier=Element14, ComponentLink4URL=https://datasheet.ciiva.com/28450/1489800-28450377.pdf?src-supplier=Element14, ComponentLink5Description=https://datasheet.ciiva.com/176/mlccorderingcode-176349.pdf?src-supplier=Digi-Key, ComponentLink5URL=https://datasheet.ciiva.com/176/mlccorderingcode-176349.pdf?src-supplier=Digi-Key, ComponentLink6Description=https://datasheet.ciiva.com/176/mlccorderingcode-176348.pdf?src-supplier=Digi-Key, ComponentLink6URL=https://datasheet.ciiva.com/176/mlccorderingcode-176348.pdf?src-supplier=Digi-Key, ComponentLink7Description=https://datasheet.ciiva.com/176/mlccorderingcode-176350.pdf?src-supplier=Digi-Key, ComponentLink7URL=https://datasheet.ciiva.com/176/mlccorderingcode-176350.pdf?src-supplier=Digi-Key, Depth=0.5mm, Halogen Free="Halogen Free", Height=0.5mm, Item Type=Capacitor, Lead Free="Lead Free", Length=1mm, Manufacturer Part Number=CC0402KRX7R9BB103, Mount="Surface Mount", Packaging="Tape and Reel", Pricing 1="10000=0.00178 (USD)", Radiation Hardening=No, Reach SVHC Compliant=Yes, RoHS=Yes, RoHS Compliant=Yes, Series=CC, Stock 1=995000, Supplier 1=Avnet, Supplier Part Number 1=CC0402KRX7R9BB103, Termination=SMD/SMT, Thickness=0.022inch, Voltage Rating=50V, Voltage Rating (DC)=50V, Width=0.02inch
C18 C30: library part CC0402KRX7R8BB102, "CAP CER 1000PF 25V X7R 0402", Case Code (Imperial)=0402, Case Code (Metric)=1005, Dielectric=X7R, Insulation Resistance=10GR, LCSC Part Number=C541372, Manufacturer=Yageo, Max Operating Temperature=125°C, Min Operating Temperature=-55°C, Tolerance=10%, Voltage Rating=25V, Capacitance=1nF, Case/Package=0402, Category="Ceramic Capacitors", ComponentLink1Description=https://datasheet.ciiva.com/26862/getdatasheetpartid-639817-26862638.pdf?src-supplier=Verical, ComponentLink1URL=https://datasheet.ciiva.com/26862/getdatasheetpartid-639817-26862638.pdf?src-supplier=Verical, ComponentLink2Description=https://datasheet.ciiva.com/5425/upy-gp-np0-16v-to-50v-8-3714-5425527.pdf?src-supplier=Mouser, ComponentLink2URL=https://datasheet.ciiva.com/5425/upy-gp-np0-16v-to-50v-8-3714-5425527.pdf?src-supplier=Mouser, Depth=0.5mm, Dissipation Factor=2.5%, Halogen Free="Halogen Free", Item Type=Capacitor, Lead Free="Lead Free", Length=1mm, Manufacturer Part Number=CC0402KRX7R8BB102, Mount="Surface Mount", Number of Pins=2, Packaging="Tape and Reel", Pricing 1="1=0.00230, 10000=0.00230, 100001=0.00190 (USD)", Radiation Hardening=No, RoHS=Yes, RoHS Compliant=Yes, Series=CC, Stock 1=370000, Supplier 1="Arrow Electronics", Supplier Part Number 1=CC0402KRX7R8BB102, Termination=SMD/SMT, Thickness=0.022inch, Voltage Rating (DC)=25V, Width=0.02inch
C19: library part CC0402BRNPO9BN4R7, "CAP CER 4.7PF 50V C0G/NPO 0402", Case Code (Imperial)=0402, Case Code (Metric)=1005, Dielectric=C0G, LCSC Part Number=C325453, Manufacturer=Yageo, Max Operating Temperature=125°C, Min Operating Temperature=-55°C, Package Quantity=10000, Supplier Part Number=8379141, Voltage Rating=50V, Case/Package=0402, Category="Ceramic Capacitors", ComponentLink1Description=https://datasheet.ciiva.com/11587/upy-gp-np0-16v-to-50v-8-11587134.pdf?src-supplier=Avnet, ComponentLink1URL=https://datasheet.ciiva.com/11587/upy-gp-np0-16v-to-50v-8-11587134.pdf?src-supplier=Avnet, ComponentLink2Description=https://datasheet.ciiva.com/13385/upy-gp-np0-16v-to-50v-8-13385886.pdf?src-supplier=Mouser, ComponentLink2URL=https://datasheet.ciiva.com/13385/upy-gp-np0-16v-to-50v-8-13385886.pdf?src-supplier=Mouser, Depth=0.5mm, Halogen Free=5694HalogenFree, Item Type=Capacitor, Lead Free="Lead Free", Length=1mm, Manufacturer Part Number=CC0402BRNPO9BN4R7, Mounting Technology="Surface Mount", Packaging="Tape and Reel", Pricing="10000=0.0031, 40000=0.0029, 150000=0.0027, 250000=0.0027, 500000=0.0025 (USD)", Radiation Hardening=No, RoHS=Yes, RoHS Compliant=Yes, Series=CC, Stock=80000, Supplier="Future Electronics", Termination=SMD/SMT, Voltage Rating (DC)=50V, Width=0.5mm
C20: library part 04025C222JAT2A, "CAP CER 2.2nF 50V X7R ±5% 0402 MLCC - SMD/SMT ROHS", LCSC Part Number=C597041, Manufacturer="Kyocera AVX", Package=0402, ComponentLink1Description=LCSC, ComponentLink1URL=https://www.lcsc.com/product-detail/Multilayer-Ceramic-Capacitors-MLCC-SMD-SMT_Kyocera-AVX-04025C222JAT2A_C597041.html, Item Type=Capacitor, Manufacturer Part Number=04025C222JAT2A
C21: library part CC0402BRNPO9BN1R5, "CAP CER 1.5PF 50V C0G/NPO 0402", LCSC Part Number=C282238, Manufacturer=Yageo, Supplier Part Number=6564710, Temperature Coefficient=30ppm/°C, Category="Ceramic Capacitors", ComponentLink1Description=https://datasheet.ciiva.com/15189/getdatasheetpartid-403423-15189101.pdf?src-supplier=Verical, ComponentLink1URL=https://datasheet.ciiva.com/15189/getdatasheetpartid-403423-15189101.pdf?src-supplier=Verical, ComponentLink2Description=https://datasheet.ciiva.com/11587/upy-gp-np0-16v-to-50v-8-11587119.pdf?src-supplier=Avnet, ComponentLink2URL=https://datasheet.ciiva.com/11587/upy-gp-np0-16v-to-50v-8-11587119.pdf?src-supplier=Avnet, ComponentLink3Description=https://datasheet.ciiva.com/13263/upy-gp-np0-16v-to-50v-8-3714-13263317.pdf?src-supplier=Mouser, ComponentLink3URL=https://datasheet.ciiva.com/13263/upy-gp-np0-16v-to-50v-8-3714-13263317.pdf?src-supplier=Mouser, Halogen Free=5694HalogenFree, Item Type=Capacitor, Manufacturer Part Number=CC0402BRNPO9BN1R5, Pricing="10000=0.0033, 40000=0.0031, 150000=0.003, 300000=0.0029, 750000=0.0027 (USD)", RoHS=Yes, Stock=530000, Supplier="Future Electronics"
C22: library part CC0402BRNPO9BN1R0, "CAP CER 1PF 50V C0G/NPO 0402", LCSC Part Number=C309455, Manufacturer=Yageo, Supplier Part Number=7847221, Temperature Coefficient=30ppm/°C, Category="Ceramic Capacitors", ComponentLink1Description=https://datasheet.ciiva.com/26862/getdatasheetpartid-403422-26862565.pdf?src-supplier=Verical, ComponentLink1URL=https://datasheet.ciiva.com/26862/getdatasheetpartid-403422-26862565.pdf?src-supplier=Verical, ComponentLink2Description=https://datasheet.ciiva.com/11587/upy-gp-np0-16v-to-50v-8-11587115.pdf?src-supplier=Avnet, ComponentLink2URL=https://datasheet.ciiva.com/11587/upy-gp-np0-16v-to-50v-8-11587115.pdf?src-supplier=Avnet, Halogen Free=5694HalogenFree, Item Type=Capacitor, Manufacturer Part Number=CC0402BRNPO9BN1R0, Pricing="10000=0.0034, 40000=0.0032, 150000=0.0031, 250000=0.003, 500000=0.0028 (USD)", RoHS=Yes, Stock=180000, Supplier="Future Electronics"
C24: library part FN03B333K100PLG, "10V 33nF ±10% 0201 Multilayer Ceramic Capacitors MLCC - SMD/SMT ROHS", LCSC Part Number=C565516, Manufacturer=PSA, Package=0201, Item Type=Capacitor, Manufacturer Part Number=FN03B333K100PLG
C26: library part CC0201BRNPO8BNR80, "CAP CER 0.8PF 25V C0G/NP0 0201", LCSC Part Number=C5182417, Manufacturer=Yageo, Supplier Part Number=13-CC0201BRNPO8BNR80CT-ND, Category="Ceramic Capacitors", Item Type=Capacitor, Manufacturer Part Number=CC0201BRNPO8BNR80, Pricing="1=0.1, 10=0.015, 50=0.0088, 100=0.0069, 500=0.00516, 1000=0.00406, 2500=0.00369, 5000=0.00339 (USD)", RoHS=No, Supplier=Digikey
C27: library part CC0201BRNPO9BN6R2, "CAP CER 6.2PF 50V C0G/NP0 0201", LCSC Part Number=C5591166, Manufacturer=Yageo, Supplier Part Number=13-CC0201BRNPO9BN6R2TR-ND, Category="Ceramic Capacitors", Item Type=Capacitor, Manufacturer Part Number=CC0201BRNPO9BN6R2, Pricing="15000=0.00295 (USD)", RoHS=No, Supplier=Digikey
J1: "5A 1 16P Female Type-C SMD USB Connectors ROHS", LCSC Part Number=C165948, Manufacturer="Korean Hroparts Elec", ComponentLink1Description=LCSC, ComponentLink1URL=https://www.lcsc.com/product-detail/USB-Connectors_Korean-Hroparts-Elec-TYPE-C-31-M-12_C165948.html, Item Type="USB Connector", Manufacturer Part Number=TYPE-C-31-M-12
J2: "CONN SPRING MOD 3POS SMD", Manufacturer=Samtec, Supplier Part Number=200-SIB10302FSLC, ComponentLink1Description=http://www.farnell.com/datasheets/2045641.pdf?src-supplier=Farnell, ComponentLink1URL=http://www.farnell.com/datasheets/2045641.pdf?src-supplier=Farnell, ComponentLink2Description=http://www.samtec.com/ftppub/pdf/sib_sm.pdf?src-supplier=Avnet, ComponentLink2URL=http://www.samtec.com/ftppub/pdf/sib_sm.pdf?src-supplier=Avnet, ComponentLink3Description=https://datasheet.octopart.com/SIB-103-02-F-S-LC-Samtec-datasheet-62107142.pdf?src-supplier=Farnell, ComponentLink3URL=https://datasheet.octopart.com/SIB-103-02-F-S-LC-Samtec-datasheet-62107142.pdf?src-supplier=Farnell, ComponentLink4Description=https://datasheet.octopart.com/SIB-103-02-F-S-LC-Samtec-datasheet-21214619.pdf?src-supplier=Newark, ComponentLink4URL=https://datasheet.octopart.com/SIB-103-02-F-S-LC-Samtec-datasheet-21214619.pdf?src-supplier=Newark, ComponentLink5Description=https://datasheet.octopart.com/SIB-103-02-F-S-LC-Samtec-datasheet-97278993.pdf?src-supplier=Samtec, ComponentLink5URL=https://datasheet.octopart.com/SIB-103-02-F-S-LC-Samtec-datasheet-97278993.pdf?src-supplier=Samtec, ComponentLink6Description=https://datasheet.octopart.com/SIB-103-02-F-S-LC-Samtec-datasheet-151555637.pdf?src-supplier=Sager+Electronics, ComponentLink6URL=https://datasheet.octopart.com/SIB-103-02-F-S-LC-Samtec-datasheet-151555637.pdf?src-supplier=Sager+Electronics, Connector Type=Non-Gendered, Contact Material=Bronze, Contact Plating=Gold, Item Type=Connectors, Manufacturer Part Number=SIB-103-02-F-S-LC, Material=Bronze, Number of Contacts=3, Number of Rows=1, Packaging=Rail/Tube, Pitch=2.54mm, Pricing="1=3.25, 10=3.25, 50=2.65, 100=2.65, 1000=2, 10000=0.95 (USD)", Radiation Hardening=No, Reach SVHC Compliant=No, RoHS=Yes, RoHS Compliant=Yes, Series=SIB, Stock=145, Supplier=Mouser, Termination=SMD/SMT
J3: library part C145963, "1x6P SH 1 1mm 6 SMD,P=1mm Wire To Board / Wire To Wire Connector ROHS", Manufacturer=BOOMELE, Package=SMD,P=1mm, ComponentLink1Description=LCSC, ComponentLink1URL=https://www.lcsc.com/product-detail/Wire-To-Board-Wire-To-Wire-Connector_BOOMELE-Boom-Precision-Elec-C145963_C145963.html, Item Type=Connector, LCSC Part Number=C145963, Manufacturer Part Number=C145963
L1: library part LQP03TG6N8H02D, "FIXED IND 6.8NH 200MA 1.15OHM SM", Case/Package=0201, Current Rating=200mA, DC Resistance (DCR)=1.15R, LCSC Part Number=C86120, Manufacturer=Murata, Max Operating Temperature=125°C, Min Operating Temperature=-55°C, Package Quantity=15000, Self Resonant Frequency=5.4GHz, Supplier Part Number=490-LQP03TG6N8H02DCT-ND, Test Frequency=500MHz, Tolerance=3%, Category="Fixed Inductors", ComponentLink1Description=https://datasheet.octopart.com/LQP03TG6N8H02D-Murata-datasheet-140317395.pdf?src-supplier=Farnell, ComponentLink1URL=https://datasheet.octopart.com/LQP03TG6N8H02D-Murata-datasheet-140317395.pdf?src-supplier=Farnell, ComponentLink2Description=https://search.murata.co.jp/Ceramy/image/img/P02/JELF243C-0016.pdf?src-supplier=Digikey, ComponentLink2URL=https://search.murata.co.jp/Ceramy/image/img/P02/JELF243C-0016.pdf?src-supplier=Digikey, DC Current=200mA, Depth=0.33mm, Height - Seated (Max)=0.013inch, Item Type=Inductor, Length=0.024inch, Manufacturer Part Number=LQP03TG6N8H02D, Military Standard=Not, Mounting Technology="Surface Mount", Packaging="Tape and Reel", Pricing="1=0.1, 10=0.025, 25=0.024, 50=0.0204, 100=0.0172, 250=0.01644, 500=0.01494, 1000=0.01255, 2500=0.01075 (USD)", RoHS=Yes, RoHS Compliant=Yes, Series=LQP03TG_02, Shielding=Unshielded, Stock=13400, Supplier=Digikey, Technology="THIN FILM", Width=0.012inch
L2: library part MLG0603P2N0CT000, "FIXED IND 2NH 600MA 100 MOHM SMD", Case Code (Imperial)=0201, Case Code (Metric)=0603, Current Rating=600mA, DC Resistance (DCR)=100mR, LCSC Part Number=C531323, Manufacturer=TDK, Max Operating Temperature=125°C, Min Operating Temperature=-55°C, Package Quantity=15000, Self Resonant Frequency=8.5GHz, Supplier Part Number=445-172431-1-ND, Test Frequency=500MHz, Case/Package=0201, Category="Fixed Inductors", ComponentLink1Description=https://datasheet.ciiva.com/41860/inductor-commercial-high-frequency-mlg-qp-en-41860968.pdf?src-supplier=Digi-Key, ComponentLink1URL=https://datasheet.ciiva.com/41860/inductor-commercial-high-frequency-mlg-qp-en-41860968.pdf?src-supplier=Digi-Key, Core Material=Non-Magnetic, Height - Seated (Max)=0.013inch, Item Type=Inductor, Length=0.024inch, Manufacturer Part Number=MLG0603P2N0CT000, Mounting Technology="Surface Mount", Packaging="Cut Tape", Pricing="1=0.13, 10=0.118, 25=0.1, 50=0.0882, 100=0.0808, 250=0.07352, 500=0.06908, 1000=0.05292, 2500=0.04998 (USD)", RoHS=Yes, RoHS Compliant=Yes, Series=MLG-P, Shielding=Unshielded, Stock=23499, Supplier=Digi-Key, Width=0.012inch
L3: library part LQP03TN24NH02D, "140mA 24nH ±3% 2.3Ω 0201 Inductors (SMD) ROHS", Case Code (Imperial)=0201, Case Code (Metric)=0603, Current Rating=140mA, DC Resistance (DCR)=2.3R, LCSC Part Number=C206441, Manufacturer=Murata, Max Operating Temperature=125°C, Min Operating Temperature=-55°C, Package Quantity=15000, Self Resonant Frequency=2GHz, Supplier Part Number=490-13004-1-ND, Test Frequency=500MHz, Tolerance=3%, Case/Package=0201, Category="Fixed Inductors", ComponentLink1Description=https://datasheet.ciiva.com/29692/s0084e-29692461.pdf?src-supplier=Digi-Key, ComponentLink1URL=https://datasheet.ciiva.com/29692/s0084e-29692461.pdf?src-supplier=Digi-Key, Core Material=Non-Magnetic, DC Current=140mA, Depth=0.33mm, Height - Seated (Max)=0.013inch, Item Type=Inductor, Length=0.024inch, Manufacturer Part Number=LQP03TN24NH02D, Military Standard=Not, Mounting Technology="Surface Mount", Packaging="Tape and Reel", Pricing="1=0.1, 10=0.041, 25=0.0364, 50=0.031, 100=0.0273, 250=0.025, 500=0.02272, 1000=0.01909, 2500=0.01636 (USD)", RoHS=Yes, RoHS Compliant=Yes, Series=LQP03TN_02, Shielding=Unshielded, Stock=40849, Supplier=Digi-Key, Technology="THIN FILM", Width=0.012inch
L4: library part CS0402-2N7J-S, "640mA 2.7nH ±5% 120mΩ 0402 Inductors (SMD) ROHS", LCSC Part Number=C142181, Manufacturer="Chilisin Elec", Package=0402, ComponentLink1Description=LCSC, ComponentLink1URL=https://www.lcsc.com/product-detail/Inductors-SMD_Chilisin-Elec-CS0402-2N7J-S_C142181.html, Item Type=Inductors, Manufacturer Part Number=CS0402-2N7J-S
L5: library part LQG15HS8N2J02D, "FIXED IND 8.2NH 550MA 240MOHM SM", Case Code (Imperial)=0402, Case Code (Metric)=1005, Current Rating=300mA, DC Resistance (DCR)=240mR, LCSC Part Number=C98003, Manufacturer=Murata, Max Operating Temperature=125°C, Min Operating Temperature=-55°C, Package Quantity=1, Self Resonant Frequency=3.7GHz, Supplier Part Number=81-LQG15HS8N2J02D, Test Frequency=100MHz, Tolerance=5%, Case/Package=0402, Category="Fixed Inductors", ComponentLink1Description=https://datasheet.ciiva.com/11799/0900766b8090d685-11799047.pdf?src-supplier=Rs, ComponentLink1URL=https://datasheet.ciiva.com/11799/0900766b8090d685-11799047.pdf?src-supplier=Rs, ComponentLink2Description=https://datasheet.ciiva.com/1038/l0075s0083lqg15hs-1038112.pdf?src-supplier=Digikey, ComponentLink2URL=https://datasheet.ciiva.com/1038/l0075s0083lqg15hs-1038112.pdf?src-supplier=Digikey, ComponentLink3Description=https://datasheet.ciiva.com/1038/l0075s0083lqg15hs-1038113.pdf?src-supplier=Digikey, ComponentLink3URL=https://datasheet.ciiva.com/1038/l0075s0083lqg15hs-1038113.pdf?src-supplier=Digikey, ComponentLink4Description=https://datasheet.ciiva.com/1038/l0075s0083lqg15hs-1038114.pdf?src-supplier=Digikey, ComponentLink4URL=https://datasheet.ciiva.com/1038/l0075s0083lqg15hs-1038114.pdf?src-supplier=Digikey, ComponentLink5Description=https://datasheet.ciiva.com/8510/l0075s0083lqg15hs-8510877.pdf?src-supplier=Avnet, ComponentLink5URL=https://datasheet.ciiva.com/8510/l0075s0083lqg15hs-8510877.pdf?src-supplier=Avnet, ComponentLink6Description=https://datasheet.ciiva.com/16208/l0075s0083lqg15hs-16208342.pdf?src-supplier=Future+Electronics, ComponentLink6URL=https://datasheet.ciiva.com/16208/l0075s0083lqg15hs-16208342.pdf?src-supplier=Future+Electronics, Core Material=Air, DC Current=300mA, Depth=0.55mm, Height=0.5mm, Height - Seated (Max)=0.022inch, Item Type=Inductor, Lead Free="Lead Free", Length=1mm, Manufacturer Part Number=LQG15HS8N2J02D, Max Current Rating=300mA, Max DC Current=300mA, Military Standard=Not, Mounting Technology="Surface Mount", Packaging="Tape and Reel", Pricing="1=0.1, 10=0.037, 50=0.037, 100=0.029, 1000=0.022, 10000=0.018 (USD)", Q Factor=8, RoHS=Yes, RoHS Compliant=Yes, Series=LQG15HS, Shielding=Unshielded, Stock=748, Supplier=Mouser, Termination=SMD/SMT, Weight=2.3E-05oz, Width=0.02inch
L6: library part CS0402-3N9J-S, "840mA 3.9nH ±5% 66mΩ 0402 Inductors (SMD) ROHS", LCSC Part Number=C329623, Manufacturer="Chilisin Elec", Package=0402, ComponentLink1Description=LCSC, ComponentLink1URL=https://www.lcsc.com/product-detail/Inductors-SMD_Chilisin-Elec-CS0402-3N9J-S_C329623.html, Item Type=Inductor, Manufacturer Part Number=CS0402-3N9J-S
LED1: library part NCD0603R3, "RED LED 0603 Light Emitting Diodes", LCSC Part Number=C3151730, Manufacturer="Foshan NationStar Optoelectronics", Package=0603, ComponentLink1Description=LCSC, ComponentLink1URL=https://www.lcsc.com/product-detail/Light-Emitting-Diodes-LED_Foshan-NationStar-Optoelectronics-NCD0603R3_C3151730.html, Item Type=LED, Manufacturer Part Number=NCD0603R3
LED2 LED9 LED10 LED11: "SMD,2.4x2.7mm RGB LEDs(Built-in IC) ROHS", LCSC Part Number=C4154872, Manufacturer=WORLDSEMI, Item Type=LED, Manufacturer Part Number=WS2812C-2427, RoHS=No, Supplier=LCSC
LED3 LED4 LED5 LED6 LED7 LED8: library part NCD0603G2, "Emerald 0603 Light Emitting Diodes (LED) ROHS", LCSC Part Number=C87326, Manufacturer="Foshan NationStar Optoelectronics", Package=0603, ComponentLink1Description=LCSC, ComponentLink1URL=https://www.lcsc.com/product-detail/Light-Emitting-Diodes-LED_Foshan-NationStar-Optoelectronics-NCD0603G2_C87326.html, Item Type=LED, Manufacturer Part Number=NCD0603G2
Q1: "N-CHANNEL 20-V (D-S) MOSFET", LCSC Part Number=C5310968, Manufacturer="TECH PUBLIC", Manufacturer Part Number=SI2302CDS, Package=SOT-23, ComponentLink1Description=LCSC, ComponentLink1URL=https://www.lcsc.com/product-detail/MOSFETs_TECH-PUBLIC-SI2302CDS_C5310968.html, Item Type=Mosfet